# Altium PCB BOARD_4LAYER.PcbDoc (part 18 of 21)
Units mil, origin at the board's own origin, x right, y up, seen from the top; angles counter-clockwise.
Board outline 6692.91 x 10039.37 mil, 4 copper layers (Top Layer, Mid Layer 1, Mid Layer 2, Bottom Layer), stack 66.299 mil thick; 1532 components, 908 nets, 4105 pads, 1286 vias.
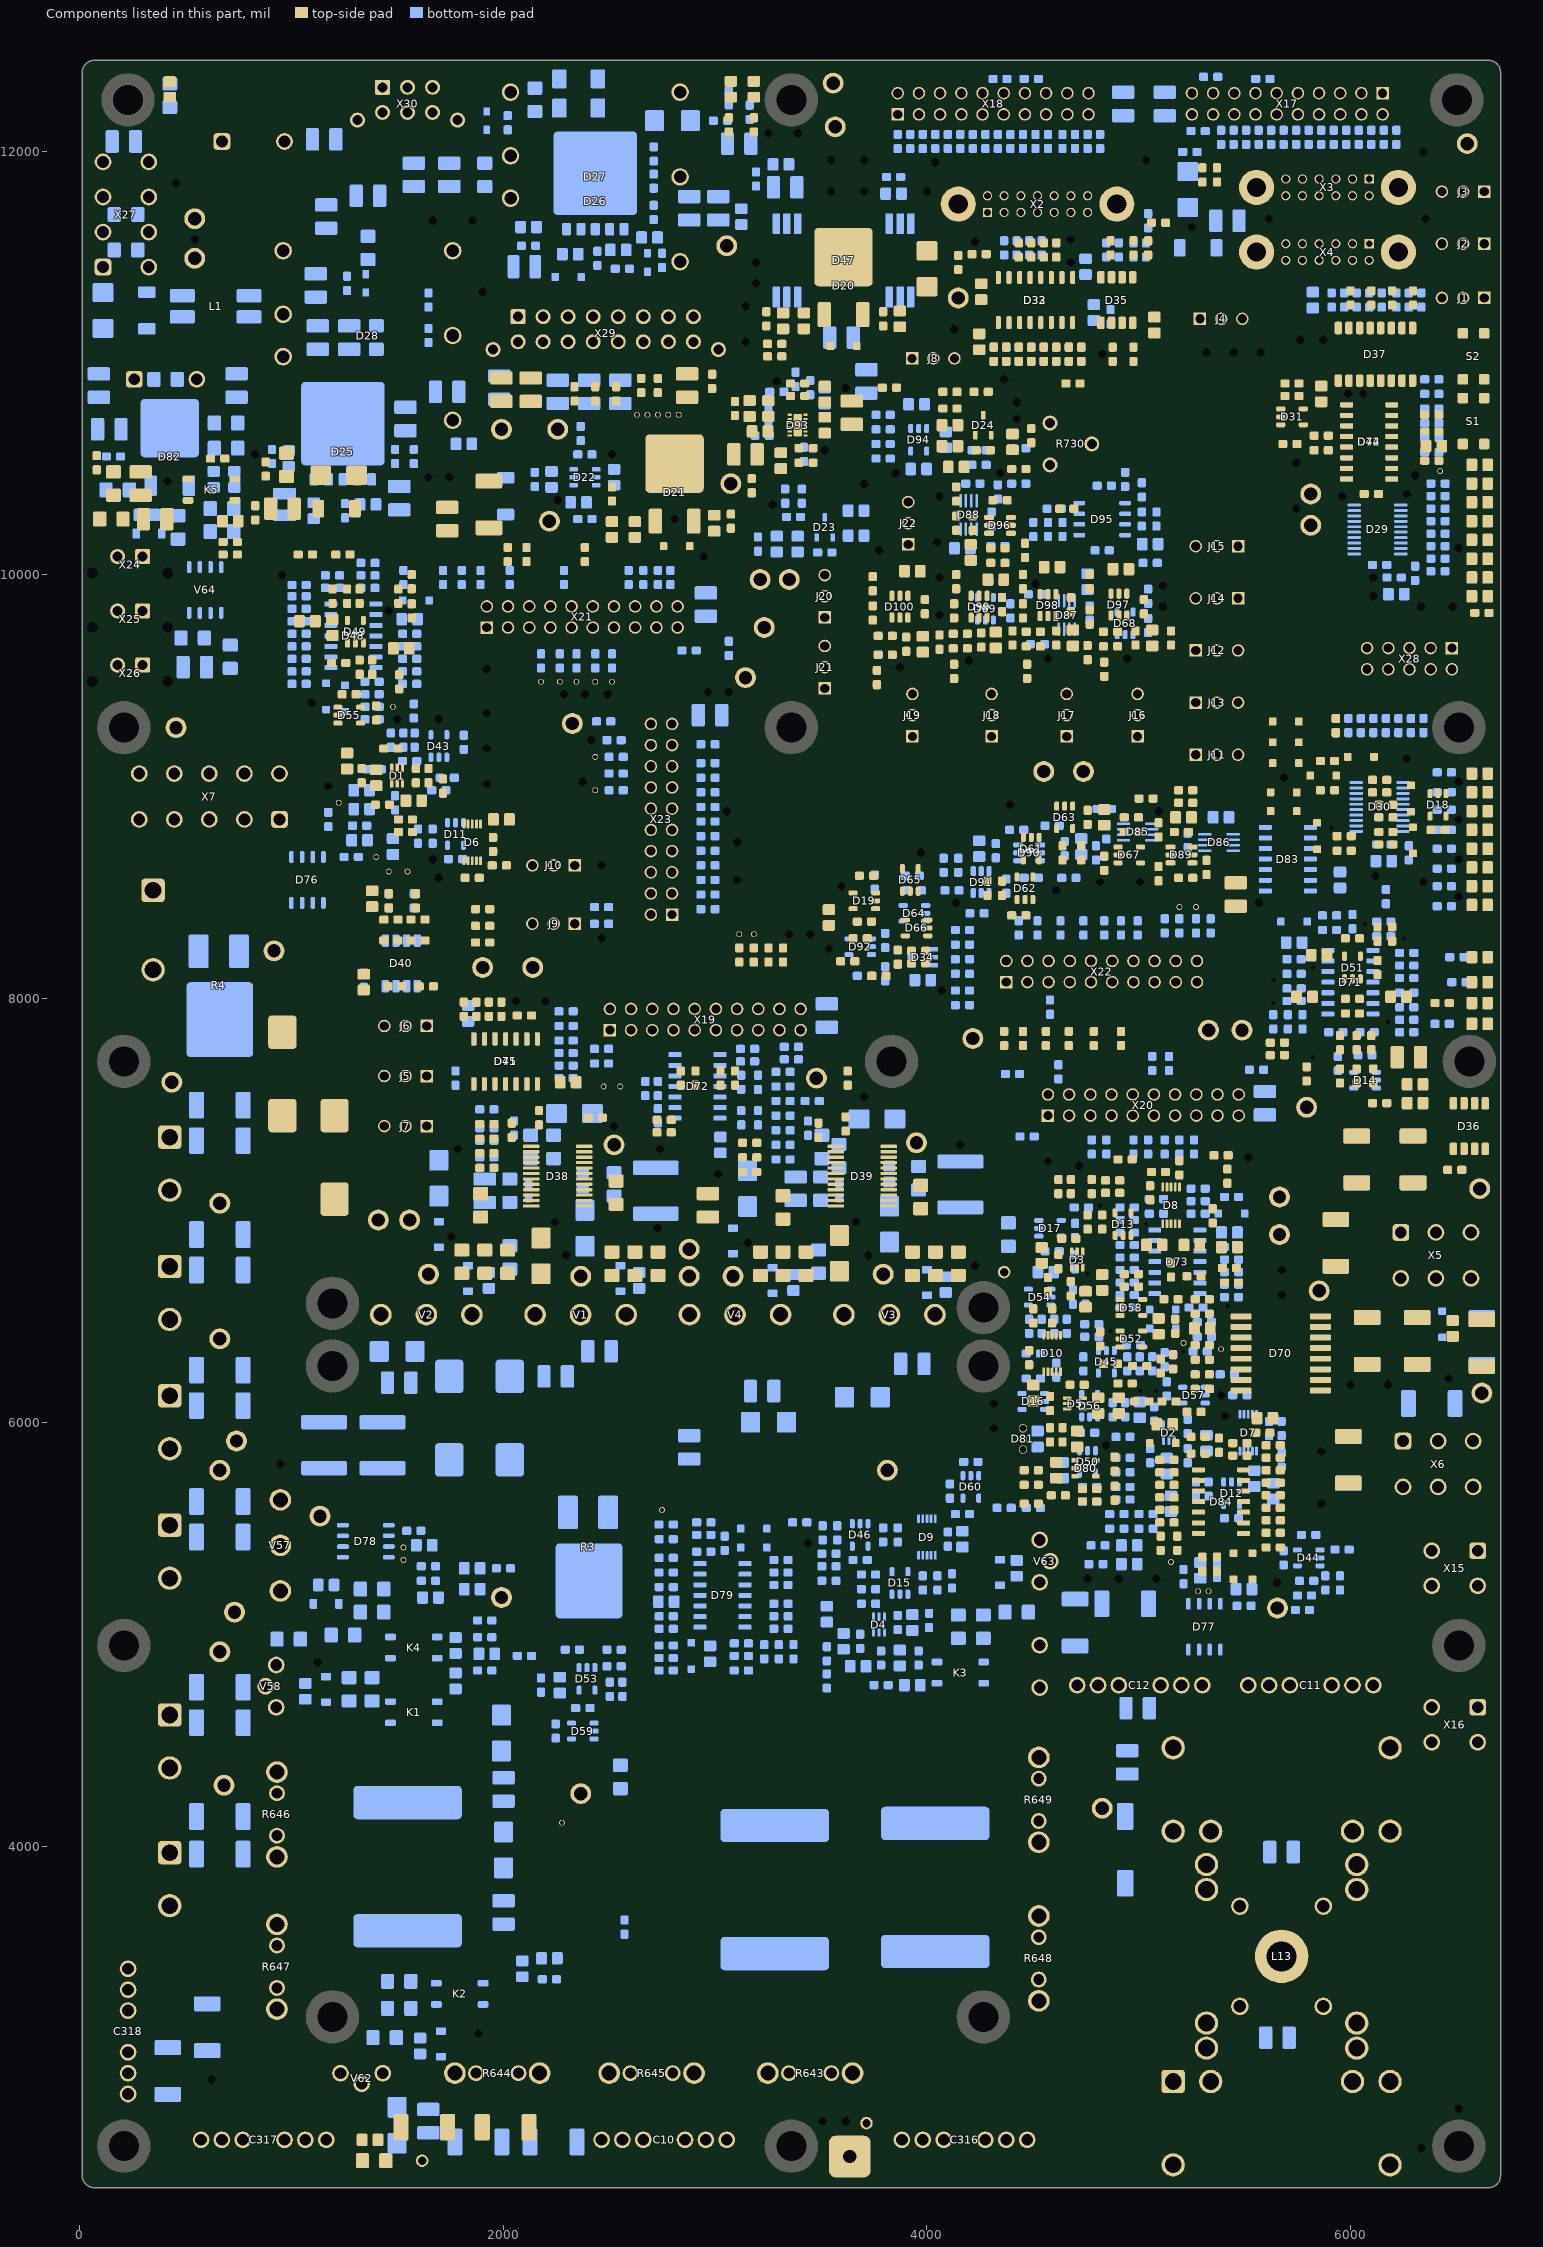
[diagram p20: the components of this part, seen from the top]

## Polygon pours and split planes (outlines as drawn) (continued)
$6N134 on Mid Layer 1 "$6N134_L-01_P114" (solid, remove dead copper, pour order 114): 643.7,3216.54 761.81,3216.54 761.81,3846.46 643.7,3846.46
$6N134 on Mid Layer 1 "$6N134_L-01_P113" (solid, remove dead copper, pour order 113): 643.7,3846.46 978.35,3846.46 978.35,4122.05 643.7,4122.05
$6N135 on Mid Layer 1 "$6N135_L-01_P105" (solid, remove dead copper, pour order 105): 4275.59,4525.59 2966.54,4525.59 2750,4309.06 2750,4387.8 2956.69,4594.49 4275.59,4594.49
$6N135 on Mid Layer 1 "$6N135_L-01_P104" (solid, remove dead copper, pour order 104): 4423.23,5194.88 4324.8,5194.88 4324.8,4525.59 4275.59,4525.59 4275.59,5263.78 4423.23,5263.78
$6N135 on Mid Layer 1 "$6N135_L-01_P102" (solid, remove dead copper, pour order 102): 4580.71,5411.42 4423.23,5411.42 4423.23,5263.78 4374.02,5263.78 4374.02,5431.1 4462.6,5519.69 4580.71,5519.69
$6N135 on Mid Layer 1 "$6N135_L-01_P094" (solid, remove dead copper, pour order 94): 1175.2,3472.44 1844.49,3472.44 1844.49,3846.46 1175.2,3846.46
$6N135 on Mid Layer 1 "$6N135_L-01_P091" (solid, remove dead copper, pour order 91): 1175.2,3472.44 860.24,3472.44 860.24,3748.03 1057.09,3748.03 1057.09,4200.79 801.18,4200.79 801.18,4338.58 722.44,4417.32 722.44,4811.02 919.29,4811.02 919.29,4712.6 840.55,4712.6 840.55,4476.38 1175.2,4476.38
$6N135 on Mid Layer 1 "$6N135_L-01_P084" (solid, remove dead copper, pour order 84): 2326.77,3708.66 2435.04,3708.66 2435.04,3944.88 2326.77,3944.88
$6N3156 on Mid Layer 1 "$6N3156_L-01_P080" (solid, remove dead copper, pour order 80): 3517.72,2842.52 3714.57,2842.52 3714.57,3059.06 3517.72,3059.06
$6N3156 on Mid Layer 1 "$6N3156_L-01_P075" (solid, remove dead copper, pour order 75): 2021.65,2881.89 2238.19,2881.89 2238.19,3118.11 2021.65,3118.11
$6N3156 on Mid Layer 1 "$6N3156_L-01_P074" (solid, remove dead copper, pour order 74): 2021.65,3118.11 2750,3118.11 2750,3216.54 2021.65,3216.54
$6N3156 on Mid Layer 1 "$6N3156_L-01_P073" (solid, remove dead copper, pour order 73): 2927.17,3059.06 3714.57,3059.06 3714.57,3137.8 2927.17,3137.8
$6N3156 on Mid Layer 1 "$6N3156_L-01_P067" (solid, remove dead copper, pour order 67): 3616.14,3885.83 2927.17,3885.83 2927.17,3059.06 2966.54,3059.06 2966.54,2881.89 2750,2881.89 2750,3915.35 3074.8,4240.16 3616.14,4240.16
$6N106 on Mid Layer 1 "$6N106_L-01_P065" (solid, remove dead copper, pour order 65): 1903.54,3393.7 1982.28,3393.7 1982.28,4417.32 1903.54,4417.32
$6N106 on Mid Layer 1 "$6N106_L-01_P064" (solid, remove dead copper, pour order 64): 1509.84,3334.65 1982.28,3334.65 1982.28,3393.7 1509.84,3393.7
$6N106 on Mid Layer 1 "$6N106_L-01_P063" (solid, remove dead copper, pour order 63): 1411.42,3000 1509.84,3000 1509.84,3393.7 1411.42,3393.7
$6N106 on Mid Layer 1 "$6N106_L-01_P062" (solid, remove dead copper, pour order 62): 1352.36,4417.32 1982.28,4417.32 1982.28,4476.38 1352.36,4476.38
$6N106 on Mid Layer 1 "$6N106_L-01_P060" (solid, remove dead copper, pour order 60): 1253.94,4417.32 1352.36,4417.32 1352.36,4564.96 1253.94,4564.96
$6N106 on Mid Layer 1 "$6N106_L-01_P059" (solid, remove dead copper, pour order 59): 919.29,4564.96 1352.36,4564.96 1352.36,4702.76 919.29,4702.76
$6N106 on Mid Layer 1 "$6N106_L-01_P052" (solid, remove dead copper, pour order 52): 17 vertices, not listed, extent 1411.42,2566.93 3399.61,3059.06
$6N3315 on Mid Layer 1 "$6N3315_L-01_P048" (solid, remove dead copper, pour order 48): 21 vertices, not listed, extent 4364.17,3196.85 4718.5,5401.57
+U_AMP on Mid Layer 1 "+U_AMP_L-01_P044" (solid, remove dead copper, pour order 44): 6175.2,5362.2 6687.01,5362.2 6687.01,5480.31 6175.2,5480.31
+U_AMP on Mid Layer 1 "+U_AMP_L-01_P040" (solid, remove dead copper, pour order 40): 6293.31,4633.86 6687.01,4633.86 6687.01,4771.65 6293.31,4771.65
$6N94 on Mid Layer 1 "$6N94_L-01_P037" (solid, remove dead copper, pour order 37): 4127.95,2409.45 3812.99,2409.45 3812.99,3196.85 3025.59,3196.85 3025.59,3688.98 3616.14,3688.98 3616.14,3295.28 3911.42,3295.28 3911.42,2763.78 4127.95,2763.78
$6N94 on Mid Layer 1 "$6N94_L-01_P034" (solid, remove dead copper, pour order 34): 5564.96,2842.52 4856.3,2842.52 4856.3,3472.44 5466.54,3472.44 5466.54,3314.96 5564.96,3314.96
$6N101 on Mid Layer 1 "$6N101_L-01_P027" (solid, remove dead copper, pour order 27): 5702.76,4673.23 5564.96,4535.43 5564.96,3669.29 5466.54,3669.29 5466.54,3570.87 4836.61,3570.87 4836.61,3925.2 5053.15,3925.2 5053.15,4555.12 5407.48,4555.12 5407.48,4771.65 5702.76,4771.65
$6N737 on Mid Layer 1 "$6N737_L-01_P022" (solid, remove dead copper, pour order 22): 4777.56,2507.87 4226.38,2507.87 4226.38,2842.52 3990.16,2842.52 3990.16,3374.02 3753.94,3374.02 3753.94,3629.92 4324.8,3629.92 4324.8,3374.02 4088.58,3374.02 4088.58,2980.32 4777.56,2980.32
$6N737 on Mid Layer 1 "$6N737_L-01_P019" (solid, remove dead copper, pour order 19): 6687.01,2803.15 6293.31,2803.15 6293.31,2409.45 5781.5,2409.45 5781.5,3314.96 5879.92,3314.96 5879.92,3472.44 6687.01,3472.44
-U_AMP on Mid Layer 1 "-U_AMP_L-01_P011" (solid, remove dead copper, pour order 11): 6312.99,5125.98 6687.01,5125.98 6687.01,5263.78 6312.99,5263.78
-U_AMP on Mid Layer 1 "-U_AMP_L-01_P006" (solid, remove dead copper, pour order 6): 6687.01,3570.87 5879.92,3570.87 5879.92,3669.29 5781.5,3669.29 5781.5,4456.69 5840.55,4515.75 5840.55,4771.65 6135.83,4771.65 6135.83,4515.75 6687.01,4515.75
no net on Mid Layer 1 (solid, remove dead copper, pour order 0): 2996.06,5913.39 3192.91,5913.39 3192.91,6090.55 2996.06,6090.55
$4N4003 on Bottom Layer "$4N4003_L02_P652" (solid, remove dead copper, pour order 652): 230.31,10342.52 387.8,10342.52 387.8,10460.63 230.31,10460.63
$4N4003 on Bottom Layer "$4N4003_L02_P651" (solid, remove dead copper, pour order 651): 33.46,10460.63 387.8,10460.63 387.8,10509.84 33.46,10509.84
$4N4003 on Bottom Layer "$4N4003_L02_P650" (solid, remove dead copper, pour order 650): 33.46,10509.84 112.2,10509.84 112.2,10883.86 33.46,10883.86
$4N4003 on Bottom Layer "$4N4003_L02_P649" (solid, remove dead copper, pour order 649): 112.2,10785.43 181.1,10785.43 181.1,10883.86 112.2,10883.86
$4N4003 on Bottom Layer "$4N4003_L02_P648" (solid, remove dead copper, pour order 648): 112.2,10726.38 171.26,10785.43 112.2,10785.43
$6N103 on Bottom Layer "$6N103_L02_P647" (solid, remove dead copper, pour order 647): 4994.09,4043.31 4679.13,4043.31 4679.13,4535.43 4462.6,4535.43 4462.6,4811.02 4541.34,4811.02 4541.34,4633.86 4816.93,4633.86 4816.93,4377.95 4994.09,4377.95
I_AMP on Bottom Layer "I_AMP_L02_P646" (solid, remove dead copper, pour order 646): 5289.37,4870.08 4620.08,4870.08 4620.08,4889.76 4482.28,4889.76 4482.28,5007.87 5289.37,5007.87
I_AMP on Bottom Layer "I_AMP_L02_P645" (solid, remove dead copper, pour order 645): 4620.08,4692.91 4974.41,4692.91 4974.41,4870.08 4620.08,4870.08
GND_UM on Bottom Layer "GND_UM_L02_P633" (solid, remove dead copper, pour order 633): 4521.65,12320.87 4994.09,12320.87 4994.09,12389.76 4521.65,12389.76
GND_UM on Bottom Layer "GND_UM_L02_P630" (solid, remove dead copper, pour order 630): 3458.66,11346.46 3488.19,11346.46 3488.19,11671.26 3458.66,11671.26
GND_UM on Bottom Layer "GND_UM_L02_P629" (solid, remove dead copper, pour order 629): 6273.62,11907.48 6687.01,11907.48 6687.01,12389.76 6273.62,12389.76
GND_UM on Bottom Layer "GND_UM_L02_P627" (solid, remove dead copper, pour order 627): 3488.19,11228.35 3763.78,11228.35 3763.78,12389.76 3488.19,12389.76
GND_UM on Bottom Layer "GND_UM_L02_P626" (solid, remove dead copper, pour order 626): 3458.66,11228.35 3488.19,11228.35 3488.19,11346.46 3458.66,11346.46
GND_UM on Bottom Layer "GND_UM_L02_P625" (solid, remove dead copper, pour order 625): 3763.78,11454.72 3832.68,11454.72 3832.68,12045.28 3763.78,12045.28
GND_UM on Bottom Layer "GND_UM_L02_P624" (solid, remove dead copper, pour order 624): 3832.68,11454.72 3763.78,11385.83 3763.78,11454.72
GND_UM on Bottom Layer "GND_UM_L02_P623" (solid, remove dead copper, pour order 623): 3458.66,11671.26 3488.19,11700.79 3488.19,11671.26
GND_UM on Bottom Layer "GND_UM_L02_P622" (solid, remove dead copper, pour order 622): 4068.9,11375.98 4285.43,11375.98 4285.43,11641.73 4068.9,11641.73
GND_UM on Bottom Layer "GND_UM_L02_P621" (solid, remove dead copper, pour order 621): 4226.38,11228.35 4285.43,11228.35 4285.43,11375.98 4226.38,11375.98
GND_UM on Bottom Layer "GND_UM_L02_P620" (solid, remove dead copper, pour order 620): 4187.01,11375.98 4226.38,11336.61 4226.38,11375.98
GND_UM on Bottom Layer "GND_UM_L02_P619" (solid, remove dead copper, pour order 619): 4954.72,11740.16 5092.52,11740.16 5092.52,12114.17 4954.72,12114.17
GND_UM on Bottom Layer "GND_UM_L02_P618" (solid, remove dead copper, pour order 618): 5092.52,11740.16 5151.57,11740.16 5151.57,11927.17 5092.52,11927.17
GND_UM on Bottom Layer "GND_UM_L02_P617" (solid, remove dead copper, pour order 617): 5092.52,11986.22 5151.57,11927.17 5092.52,11927.17
GND_UM on Bottom Layer "GND_UM_L02_P616" (solid, remove dead copper, pour order 616): 4994.09,12114.17 5043.31,12114.17 5043.31,12389.76 4994.09,12389.76
GND_UM on Bottom Layer "GND_UM_L02_P615" (solid, remove dead copper, pour order 615): 5043.31,12340.55 5250,12340.55 5250,12389.76 5043.31,12389.76
GND_UM on Bottom Layer "GND_UM_L02_P614" (solid, remove dead copper, pour order 614): 5663.39,11188.98 5879.92,11188.98 5879.92,11267.72 5663.39,11267.72
GND_UM on Bottom Layer "GND_UM_L02_P613" (solid, remove dead copper, pour order 613): 5663.39,11267.72 5742.13,11267.72 5742.13,11336.61 5663.39,11336.61
GND_UM on Bottom Layer "GND_UM_L02_P597" (solid, remove dead copper, pour order 597): 6175.2,11907.48 6273.62,12005.91 6273.62,11907.48
GND_UM on Bottom Layer "GND_UM_L02_P596" (solid, remove dead copper, pour order 596): 6145.67,11464.57 6342.52,11464.57 6342.52,11907.48 6145.67,11907.48
GND_UM on Bottom Layer "GND_UM_L02_P595" (solid, remove dead copper, pour order 595): 4797.24,11336.61 5742.13,11336.61 5742.13,11375.98 4797.24,11375.98
$4N2819 on Bottom Layer "$4N2819_L02_P591" (solid, remove dead copper, pour order 591): 1185.04,12035.43 1263.78,12035.43 1263.78,12153.54 1185.04,12153.54
$4N2819 on Bottom Layer "$4N2819_L02_P588" (solid, remove dead copper, pour order 588): 1185.04,11917.32 2120.08,11917.32 2120.08,12094.49 1185.04,12094.49
$4N2811 on Bottom Layer "$4N2811_L02_P584" (solid, remove dead copper, pour order 584): 1372.05,11710.63 2120.08,11710.63 2120.08,11868.11 1372.05,11868.11
$4N2807 on Bottom Layer "$4N2807_L02_P580" (solid, remove dead copper, pour order 580): 919.29,11169.29 1460.63,11169.29 1460.63,11346.46 919.29,11346.46
$4N2806 on Bottom Layer "$4N2806_L02_P573" (solid, remove dead copper, pour order 573): 919.29,10972.44 1559.06,10972.44 1559.06,11090.55 919.29,11090.55
$4N2806 on Bottom Layer "$4N2806_L02_P572" (solid, remove dead copper, pour order 572): 1509.84,11090.55 1559.06,11090.55 1559.06,11671.26 1509.84,11671.26
$4N2806 on Bottom Layer "$4N2806_L02_P571" (solid, remove dead copper, pour order 571): 1076.77,11582.68 1509.84,11582.68 1509.84,11671.26 1076.77,11671.26
$4N4014 on Bottom Layer "$4N4014_L02_P566" (solid, remove dead copper, pour order 566): 250,9496.06 515.75,9496.06 515.75,9712.6 250,9712.6
$4N4014 on Bottom Layer "$4N4014_L02_P562" (solid, remove dead copper, pour order 562): 427.17,9761.81 683.07,9761.81 683.07,9899.61 427.17,9899.61
$4N4014 on Bottom Layer "$4N4014_L02_P561" (solid, remove dead copper, pour order 561): 466.54,9712.6 515.75,9712.6 515.75,9761.81 466.54,9761.81
$4N4005 on Bottom Layer "$4N4005_L02_P557" (solid, remove dead copper, pour order 557): 250,10145.67 309.06,10145.67 309.06,10312.99 250,10312.99
$4N4005 on Bottom Layer "$4N4005_L02_P556" (solid, remove dead copper, pour order 556): 250,9742.13 397.64,9742.13 397.64,10145.67 250,10145.67
$4N4005 on Bottom Layer "$4N4005_L02_P555" (solid, remove dead copper, pour order 555): 397.64,9948.82 624.02,9948.82 624.02,10086.61 397.64,10086.61
$4N4016 on Bottom Layer "$4N4016_L02_P540" (solid, remove dead copper, pour order 540): 43.31,9496.06 210.63,9496.06 210.63,10175.2 43.31,10175.2
$4N4016 on Bottom Layer "$4N4016_L02_P539" (solid, remove dead copper, pour order 539): 161.42,10175.2 210.63,10175.2 210.63,10312.99 161.42,10312.99
$4N4016 on Bottom Layer "$4N4016_L02_P538" (solid, remove dead copper, pour order 538): 33.46,10175.2 161.42,10175.2 161.42,10440.94 33.46,10440.94
-U_VENT on Bottom Layer "-U_VENT_L02_P535" (solid, remove dead copper, pour order 535): 692.91,11474.41 889.76,11474.41 889.76,11661.42 692.91,11661.42
-U_VENT on Bottom Layer "-U_VENT_L02_P534" (solid, remove dead copper, pour order 534): 692.91,11395.67 1194.88,11395.67 1194.88,11474.41 692.91,11474.41
-U_VENT on Bottom Layer "-U_VENT_L02_P533" (solid, remove dead copper, pour order 533): 692.91,11287.4 889.76,11287.4 889.76,11395.67 692.91,11395.67
-U_VENT on Bottom Layer "-U_VENT_L02_P530" (solid, remove dead copper, pour order 530): 653.54,10913.39 801.18,10913.39 801.18,10982.28 653.54,10982.28
-U_VENT on Bottom Layer "-U_VENT_L02_P529" (solid, remove dead copper, pour order 529): 437.01,10864.17 653.54,10864.17 653.54,10982.28 437.01,10982.28
-U_VENT on Bottom Layer "-U_VENT_L02_P528" (solid, remove dead copper, pour order 528): 870.08,11976.38 1125.98,11976.38 1125.98,12133.86 870.08,12133.86
+U_VENT on Bottom Layer "+U_VENT_L02_P518" (solid, remove dead copper, pour order 518): 692.91,11061.02 791.34,11061.02 791.34,11179.13 692.91,11179.13
+U_VENT on Bottom Layer "+U_VENT_L02_P517" (solid, remove dead copper, pour order 517): 377.95,11021.65 791.34,11021.65 791.34,11061.02 377.95,11061.02
+U_VENT on Bottom Layer "+U_VENT_L02_P516" (solid, remove dead copper, pour order 516): 692.91,11159.45 889.76,11159.45 889.76,11248.03 692.91,11248.03
+U_VENT on Bottom Layer "+U_VENT_L02_P513" (solid, remove dead copper, pour order 513): 33.46,10913.39 200.79,10913.39 200.79,11061.02 33.46,11061.02
+U_VENT on Bottom Layer "+U_VENT_L02_P512" (solid, remove dead copper, pour order 512): 200.79,10864.17 377.95,10864.17 377.95,11061.02 200.79,11061.02
+U_VENT on Bottom Layer "+U_VENT_L02_P508" (solid, remove dead copper, pour order 508): 791.34,11021.65 889.76,11021.65 889.76,11159.45 791.34,11159.45
+U_VENT on Bottom Layer "+U_VENT_L02_P507" (solid, remove dead copper, pour order 507): 751.97,11710.63 1312.99,11710.63 1312.99,11868.11 751.97,11868.11
+U_VENT on Bottom Layer "+U_VENT_L02_P506" (solid, remove dead copper, pour order 506): 653.54,11710.63 751.97,11710.63 751.97,11986.22 653.54,11986.22
+U_VENT on Bottom Layer "+U_VENT_L02_P505" (solid, remove dead copper, pour order 505): 486.22,11986.22 771.65,11986.22 771.65,12389.76 486.22,12389.76
+U_VENT on Bottom Layer "+U_VENT_L02_P504" (solid, remove dead copper, pour order 504): 486.22,11789.37 653.54,11789.37 653.54,11986.22 486.22,11986.22
+U_VENT on Bottom Layer "+U_VENT_L02_P503" (solid, remove dead copper, pour order 503): 771.65,12242.13 1795.28,12242.13 1795.28,12389.76 771.65,12389.76
+U_VENT on Bottom Layer "+U_VENT_L02_P502" (solid, remove dead copper, pour order 502): 771.65,11868.11 830.71,11868.11 830.71,12242.13 771.65,12242.13
+U_VENT on Bottom Layer "+U_VENT_L02_P501" (solid, remove dead copper, pour order 501): 751.97,11868.11 771.65,11868.11 771.65,11986.22 751.97,11986.22
$4N2816 on Bottom Layer "$4N2816_L02_P500" (solid, remove dead copper, pour order 500): 43.31,11090.55 574.8,11090.55 574.8,11238.19 43.31,11238.19
-U_UM on Bottom Layer "-U_UM_L02_P496" (solid, remove dead copper, pour order 496): 407.48,11287.4 574.8,11287.4 574.8,11405.51 407.48,11405.51
-U_UM on Bottom Layer "-U_UM_L02_P494" (solid, remove dead copper, pour order 494): 230.31,11287.4 417.32,11287.4 417.32,12094.49 230.31,12094.49
+U_UM on Bottom Layer "+U_UM_L02_P490" (solid, remove dead copper, pour order 490): 43.31,11267.72 181.1,11267.72 181.1,12094.49 43.31,12094.49
+15V on Bottom Layer "+15V_L02_P482" (solid, remove dead copper, pour order 482): 2080.71,7438.98 2129.92,7438.98 2129.92,7517.72 2080.71,7517.72
+15V on Bottom Layer "+15V_L02_P478" (solid, remove dead copper, pour order 478): 3527.56,7409.45 3576.77,7409.45 3576.77,7478.35 3527.56,7478.35
GND on Bottom Layer "GND_L02_P471" (solid, remove dead copper, pour order 471): 2188.98,7124.02 2248.03,7124.02 2248.03,7183.07 2188.98,7183.07
GND on Bottom Layer "GND_L02_P470" (solid, remove dead copper, pour order 470): 3625.98,7124.02 3694.88,7124.02 3694.88,7183.07 3625.98,7183.07
GND on Bottom Layer "GND_L02_P415" (solid, remove dead copper, pour order 415): 5417.32,10194.88 5889.76,10194.88 5889.76,10854.33 5417.32,10854.33
GND on Bottom Layer "GND_L02_P414" (solid, remove dead copper, pour order 414): 5515.75,9043.31 5879.92,9043.31 5879.92,10194.88 5515.75,10194.88
GND on Bottom Layer "GND_L02_P413" (solid, remove dead copper, pour order 413): 5161.42,8915.35 5417.32,8915.35 5417.32,11129.92 5161.42,11129.92
GND on Bottom Layer "GND_L02_P412" (solid, remove dead copper, pour order 412): 5417.32,8925.2 5801.18,8925.2 5801.18,9043.31 5417.32,9043.31
GND on Bottom Layer "GND_L02_P411" (solid, remove dead copper, pour order 411): 3734.25,8935.04 5161.42,8935.04 5161.42,9171.26 3734.25,9171.26
GND on Bottom Layer "GND_L02_P410" (solid, remove dead copper, pour order 410): 3734.25,8748.03 4295.28,8748.03 4295.28,8935.04 3734.25,8935.04
GND on Bottom Layer "GND_L02_P409" (solid, remove dead copper, pour order 409): 5633.86,10982.28 6687.01,10982.28 6687.01,11139.76 5633.86,11139.76
GND on Bottom Layer "GND_L02_P408" (solid, remove dead copper, pour order 408): 5358.27,10854.33 5633.86,10854.33 5633.86,11257.87 5358.27,11257.87
GND on Bottom Layer "GND_L02_P407" (solid, remove dead copper, pour order 407): 5633.86,10952.76 6480.31,10952.76 6480.31,10982.28 5633.86,10982.28
GND on Bottom Layer "GND_L02_P406" (solid, remove dead copper, pour order 406): 6381.89,11139.76 6578.74,11139.76 6578.74,11877.95 6381.89,11877.95
GND on Bottom Layer "GND_L02_P405" (solid, remove dead copper, pour order 405): 6578.74,11139.76 6687.01,11139.76 6687.01,11238.19 6578.74,11238.19
GND on Bottom Layer "GND_L02_P404" (solid, remove dead copper, pour order 404): 6549.21,9427.17 6687.01,9427.17 6687.01,10982.28 6549.21,10982.28
GND on Bottom Layer "GND_L02_P403" (solid, remove dead copper, pour order 403): 1874.02,9151.57 2120.08,9151.57 2120.08,9643.7 1874.02,9643.7
GND on Bottom Layer "GND_L02_P402" (solid, remove dead copper, pour order 402): 1834.65,8688.98 2218.5,8688.98 2218.5,8974.41 1834.65,8974.41
GND on Bottom Layer "GND_L02_P401" (solid, remove dead copper, pour order 401): 2218.5,8688.98 2602.36,8688.98 2602.36,8905.51 2218.5,8905.51
GND on Bottom Layer "GND_L02_P400" (solid, remove dead copper, pour order 400): 1775.59,8974.41 2316.93,8974.41 2316.93,9151.57 1775.59,9151.57
GND on Bottom Layer "GND_L02_P399" (solid, remove dead copper, pour order 399): 2218.5,8905.51 2316.93,8905.51 2316.93,8974.41 2218.5,8974.41
GND on Bottom Layer "GND_L02_P398" (solid, remove dead copper, pour order 398): 2120.08,9151.57 2248.03,9151.57 2248.03,9437.01 2120.08,9437.01
GND on Bottom Layer "GND_L02_P397" (solid, remove dead copper, pour order 397): 5909.45,10834.65 6234.25,10834.65 6234.25,10952.76 5909.45,10952.76
GND on Bottom Layer "GND_L02_P396" (solid, remove dead copper, pour order 396): 6480.31,10952.76 6549.21,10952.76 6549.21,10982.28 6480.31,10982.28
GND on Bottom Layer "GND_L02_P394" (solid, remove dead copper, pour order 394): 4295.28,8866.14 4748.03,8866.14 4748.03,8935.04 4295.28,8935.04
GND on Bottom Layer "GND_L02_P393" (solid, remove dead copper, pour order 393): 4078.74,7438.98 4403.54,7438.98 4403.54,7586.61 4078.74,7586.61
GND on Bottom Layer "GND_L02_P392" (solid, remove dead copper, pour order 392): 3655.51,7694.88 4531.5,7694.88 4531.5,7901.57 3655.51,7901.57
GND on Bottom Layer "GND_L02_P391" (solid, remove dead copper, pour order 391): 3655.51,7586.61 4324.8,7586.61 4324.8,7694.88 3655.51,7694.88
GND on Bottom Layer "GND_L02_P390" (solid, remove dead copper, pour order 390): 4354.33,6976.38 4403.54,6976.38 4403.54,7438.98 4354.33,7438.98
$2N3778 on Bottom Layer "$2N3778_L02_P389" (solid, remove dead copper, pour order 389): 3625.98,7025.59 3665.35,7025.59 3665.35,7104.33 3625.98,7104.33
$2N3800 on Bottom Layer "$2N3800_L02_P385" (solid, remove dead copper, pour order 385): 2188.98,7025.59 2238.19,7025.59 2238.19,7104.33 2188.98,7104.33
UL on Bottom Layer "UL_L02_P377" (solid, remove dead copper, pour order 377): 3163.39,6612.2 3124.02,6651.57 3124.02,6612.2
UL on Bottom Layer "UL_L02_P376" (solid, remove dead copper, pour order 376): 3025.59,6612.2 3124.02,6612.2 3124.02,6809.06 3025.59,6809.06
UL on Bottom Layer "UL_L02_P373" (solid, remove dead copper, pour order 373): 3931.1,6917.32 4009.84,6917.32 4009.84,7015.75 3931.1,7015.75
UL on Bottom Layer "UL_L02_P366" (solid, remove dead copper, pour order 366): 17 vertices, not listed, extent 673.23,5913.39 2218.5,8334.65
UL on Bottom Layer "UL_L02_P359" (solid, remove dead copper, pour order 359): 3665.35,6297.24 3192.91,6297.24 3192.91,5913.39 2513.78,5913.39 2513.78,6080.71 3025.59,6080.71 3025.59,6612.2 3163.39,6612.2 3163.39,6366.14 3527.56,6366.14 3527.56,6612.2 3665.35,6612.2
~U_TP on Bottom Layer "~U_TP_L02_P358" (solid, remove dead copper, pour order 358): 948.82,9013.78 131.89,9013.78 131.89,8334.65 614.17,8334.65 614.17,8137.8 407.48,8137.8 407.48,8059.06 43.31,8059.06 43.31,8334.65 33.46,8334.65 33.46,9112.2 948.82,9112.2
U_TP on Bottom Layer "U_TP_L02_P354" (solid, remove dead copper, pour order 354): 1066.93,8393.7 948.82,8393.7 948.82,8433.07 230.31,8433.07 230.31,8895.67 998.03,8895.67 998.03,8797.24 850.39,8797.24 850.39,8511.81 1066.93,8511.81
$2N2430 on Bottom Layer "$2N2430_L02_P348" (solid, remove dead copper, pour order 348): 2100.39,5726.38 1017.72,5726.38 1017.72,5844.49 1657.48,5844.49 1657.48,5903.54 2100.39,5903.54
U_MOST on Bottom Layer "U_MOST_L02_P346" (solid, remove dead copper, pour order 346): 2385.83,5500 2179.13,5500 2110.24,5568.9 1568.9,5568.9 1549.21,5588.58 1303.15,5588.58 1303.15,5450.79 1185.04,5450.79 1185.04,5667.32 1637.8,5667.32 1657.48,5647.64 2159.45,5647.64 2188.98,5677.17 2385.83,5677.17
U_MOST on Bottom Layer "U_MOST_L02_P341" (solid, remove dead copper, pour order 341): 1076.77,5529.53 1185.04,5529.53 1185.04,5667.32 1076.77,5667.32
I_MOST on Bottom Layer "I_MOST_L02_P333" (solid, remove dead copper, pour order 333): 1116.14,5322.83 1303.15,5322.83 1303.15,5342.52 1116.14,5342.52
I_MOST on Bottom Layer "I_MOST_L02_P331" (solid, remove dead copper, pour order 331): 1303.15,5342.52 879.92,5342.52 879.92,5490.16 1165.35,5490.16 1165.35,5440.94 1303.15,5440.94
UH on Bottom Layer "UH_L02_P326" (solid, remove dead copper, pour order 326): 2208.66,6139.76 1588.58,6139.76 1588.58,6730.31 1086.61,6730.31 1086.61,8511.81 1214.57,8511.81 1214.57,6838.58 1706.69,6838.58 1706.69,6366.14 2070.87,6366.14 2070.87,6612.2 2208.66,6612.2
UH on Bottom Layer "UH_L02_P317" (solid, remove dead copper, pour order 317): 2494.09,6907.48 2572.83,6907.48 2572.83,6986.22 2494.09,6986.22
PGND on Bottom Layer "PGND_L02_P312" (solid, remove dead copper, pour order 312): 1765.75,5372.05 2159.45,5372.05 2159.45,5440.94 1765.75,5440.94
PGND on Bottom Layer "PGND_L02_P311" (solid, remove dead copper, pour order 311): 1765.75,5440.94 2159.45,5440.94 2159.45,5450.79 1765.75,5450.79
PGND on Bottom Layer "PGND_L02_P310" (solid, remove dead copper, pour order 310): 2159.45,5007.87 2631.89,5007.87 2631.89,5450.79 2159.45,5450.79
PGND on Bottom Layer "PGND_L02_P309" (solid, remove dead copper, pour order 309): 3970.47,5627.95 2681.1,5627.95 2681.1,5421.26 2631.89,5421.26 2631.89,5431.1 2671.26,5431.1 2671.26,5637.8 3960.63,5637.8 3960.63,5883.86 3970.47,5883.86
PGND on Bottom Layer "PGND_L02_P307" (solid, remove dead copper, pour order 307): 4561.02,4299.21 4305.12,4299.21 4305.12,3925.2 3773.62,3925.2 3773.62,4299.21 3094.49,4299.21 3094.49,4683.07 4393.7,4683.07 4393.7,4456.69 4561.02,4456.69
PGND on Bottom Layer "PGND_L02_P304" (solid, remove dead copper, pour order 304): 33.46,9387.8 574.8,9387.8 574.8,9427.17 33.46,9427.17
PGND on Bottom Layer "PGND_L02_P299" (solid, remove dead copper, pour order 299): 1372.05,6927.17 1342.52,6927.17 1342.52,7645.67 1273.62,7645.67 1273.62,8511.81 1293.31,8511.81 1293.31,7675.2 1372.05,7675.2
PGND on Bottom Layer "PGND_L02_P298" (solid, remove dead copper, pour order 298): 1076.77,8777.56 1057.09,8777.56 1057.09,9190.94 574.8,9190.94 574.8,9427.17 43.31,9427.17 43.31,9446.85 594.49,9446.85 594.49,9210.63 1076.77,9210.63
PGND on Bottom Layer "PGND_L02_P297" (solid, remove dead copper, pour order 297): 1372.05,6927.17 1618.11,6927.17 1618.11,7045.28 1372.05,7045.28
PGND on Bottom Layer "PGND_L02_P286" (solid, remove dead copper, pour order 286): 2937.01,6169.29 2494.09,6169.29 2494.09,6415.35 2779.53,6415.35 2779.53,6868.11 2937.01,6868.11
PGND on Bottom Layer "PGND_L02_P285" (solid, remove dead copper, pour order 285): 3281.5,6868.11 3360.24,6868.11 3360.24,6966.54 3281.5,6966.54
PGND on Bottom Layer "PGND_L02_P257" (solid, remove dead copper, pour order 257): 4462.6,3531.5 4600.39,3531.5 4600.39,3787.4 4462.6,3787.4
PGND on Bottom Layer "PGND_L02_P246" (solid, remove dead copper, pour order 246): 2809.06,2448.82 3104.33,2448.82 3104.33,2645.67 2809.06,2645.67
PGND on Bottom Layer "PGND_L02_P245" (solid, remove dead copper, pour order 245): 1824.8,2409.45 3104.33,2409.45 3104.33,2448.82 1824.8,2448.82
PGND on Bottom Layer "PGND_L02_P244" (solid, remove dead copper, pour order 244): 466.54,5165.35 33.46,5165.35 33.46,7192.91 486.22,7192.91 486.22,6917.32 151.57,6917.32 151.57,6562.99 505.91,6562.99 505.91,6326.77 151.57,6326.77 151.57,5342.52 466.54,5342.52
PGND on Bottom Layer "PGND_L02_P238" (solid, remove dead copper, pour order 238): 151.57,5765.75 486.22,5765.75 486.22,5982.28 151.57,5982.28
PGND on Bottom Layer "PGND_L02_P231" (solid, remove dead copper, pour order 231): 43.31,4751.97 427.17,4751.97 427.17,5165.35 43.31,5165.35
PGND on Bottom Layer "PGND_L02_P230" (solid, remove dead copper, pour order 230): 309.06,4751.97 250,4692.91 250,4751.97
PGND on Bottom Layer "PGND_L02_P229" (solid, remove dead copper, pour order 229): 23 vertices, not listed, extent 33.46,2409.45 1824.8,4751.97
PGND on Bottom Layer "PGND_L02_P209" (solid, remove dead copper, pour order 209): 3291.34,5913.39 3655.51,5913.39 3655.51,6218.5 3291.34,6218.5
PGND on Bottom Layer "PGND_L02_P208" (solid, remove dead copper, pour order 208): 3251.97,6061.02 3291.34,6061.02 3291.34,6218.5 3251.97,6218.5
PGND on Bottom Layer "PGND_L02_P202" (solid, remove dead copper, pour order 202): 1342.52,6139.76 1480.32,6139.76 1480.32,6641.73 1342.52,6641.73
PGND on Bottom Layer "PGND_L02_P177" (solid, remove dead copper, pour order 177): 3960.63,5883.86 4118.11,5883.86 4118.11,6415.35 3960.63,6415.35
$2N2408 on Bottom Layer "$2N2408_L02_P176" (solid, remove dead copper, pour order 176): 3891.73,5706.69 2572.83,5706.69 2572.83,5500 2405.51,5500 2405.51,5706.69 2297.24,5706.69 2297.24,6740.16 2435.04,6740.16 2435.04,5844.49 3763.78,5844.49 3763.78,6612.2 3891.73,6612.2
$2N2408 on Bottom Layer "$2N2408_L02_P169" (solid, remove dead copper, pour order 169): 3852.36,6651.57 3891.73,6612.2 3852.36,6612.2
$2N2408 on Bottom Layer "$2N2408_L02_P168" (solid, remove dead copper, pour order 168): 3744.09,6612.2 3763.78,6592.52 3763.78,6612.2
$2N2408 on Bottom Layer "$2N2408_L02_P167" (solid, remove dead copper, pour order 167): 3744.09,6612.2 3852.36,6612.2 3852.36,6700.79 3744.09,6700.79
U_TS on Bottom Layer "U_TS_L02_P157" (solid, remove dead copper, pour order 157): 5761.81,6070.87 5919.29,6070.87 5919.29,6307.09 5761.81,6307.09
U_TS on Bottom Layer "U_TS_L02_P150" (solid, remove dead copper, pour order 150): 6175.2,5637.8 6332.68,5637.8 6332.68,5933.07 6175.2,5933.07
U_Fin on Bottom Layer "U_FIN_L02_P148" (solid, remove dead copper, pour order 148): 5919.29,6661.42 6155.51,6661.42 6155.51,6779.53 5919.29,6779.53
U_Fin on Bottom Layer "U_FIN_L02_P147" (solid, remove dead copper, pour order 147): 5919.29,6346.46 5761.81,6346.46 5761.81,6681.1 5860.24,6779.53 5919.29,6779.53
U_Fin on Bottom Layer "U_FIN_L02_P137" (solid, remove dead copper, pour order 137): 6155.51,6661.42 6312.99,6661.42 6312.99,7015.75 6155.51,7015.75
~U_TS on Bottom Layer "~U_TS_L02_P136" (solid, remove dead copper, pour order 136): 6529.53,5637.8 6687.01,5637.8 6687.01,6287.4 6529.53,6287.4
~U_Fin on Bottom Layer "~U_FIN_L02_P132" (solid, remove dead copper, pour order 132): 6509.84,6464.57 6687.01,6464.57 6687.01,7212.6 6509.84,7212.6
+U_POWER on Bottom Layer "+U_POWER_L02_P128" (solid, remove dead copper, pour order 128): 1844.49,4299.21 2080.71,4299.21 2080.71,4476.38 1844.49,4476.38
+U_POWER on Bottom Layer "+U_POWER_L02_P127" (solid, remove dead copper, pour order 127): 1194.88,4043.31 1844.49,4043.31 1844.49,4476.38 1194.88,4476.38
+U_POWER on Bottom Layer "+U_POWER_L02_P126" (solid, remove dead copper, pour order 126): 820.87,5125.98 1017.72,5125.98 1017.72,5283.46 820.87,5283.46
+U_POWER on Bottom Layer "+U_POWER_L02_P122" (solid, remove dead copper, pour order 122): 1194.88,4338.58 1293.31,4338.58 1293.31,4476.38 1194.88,4476.38
+U_POWER on Bottom Layer "+U_POWER_L02_P121" (solid, remove dead copper, pour order 121): 820.87,4476.38 1293.31,4476.38 1293.31,4574.8 820.87,4574.8
+U_POWER on Bottom Layer "+U_POWER_L02_P120" (solid, remove dead copper, pour order 120): 820.87,3846.46 742.13,3846.46 742.13,3196.85 230.31,3196.85 230.31,3511.81 643.7,3511.81 643.7,7586.61 820.87,7586.61
$6N134 on Bottom Layer "$6N134_L02_P118" (solid, remove dead copper, pour order 118): 1372.05,2724.41 860.24,2724.41 860.24,3393.7 1017.72,3393.7 1017.72,2822.83 1372.05,2822.83
$6N134 on Bottom Layer "$6N134_L02_P117" (solid, remove dead copper, pour order 117): 1293.31,2822.83 1372.05,2822.83 1372.05,2901.57 1293.31,2901.57
$6N134 on Bottom Layer "$6N134_L02_P106" (solid, remove dead copper, pour order 106): 860.24,3846.46 1057.09,3846.46 1057.09,4102.36 860.24,4102.36
$6N135 on Bottom Layer "$6N135_L02_P099" (solid, remove dead copper, pour order 99): 1844.49,3708.66 1923.23,3708.66 1923.23,3807.09 1844.49,3807.09
$6N135 on Bottom Layer "$6N135_L02_P098" (solid, remove dead copper, pour order 98): 1194.88,3748.03 1844.49,3748.03 1844.49,3807.09 1194.88,3807.09
$6N135 on Bottom Layer "$6N135_L02_P092" (solid, remove dead copper, pour order 92): 879.92,4181.1 1057.09,4181.1 1057.09,4417.32 879.92,4417.32
$6N135 on Bottom Layer "$6N135_L02_P090" (solid, remove dead copper, pour order 90): 840.55,3492.13 1844.49,3492.13 1844.49,3748.03 840.55,3748.03
$6N135 on Bottom Layer "$6N135_L02_P087" (solid, remove dead copper, pour order 87): 1923.23,3708.66 2425.2,3708.66 2425.2,3944.88 1923.23,3944.88
$6N3156 on Bottom Layer "$6N3156_L02_P083" (solid, remove dead copper, pour order 83): 2021.65,2901.57 2297.24,2901.57 2297.24,3196.85 2021.65,3196.85
$6N3156 on Bottom Layer "$6N3156_L02_P081" (solid, remove dead copper, pour order 81): 3498.03,2842.52 3734.25,2842.52 3734.25,3137.8 3498.03,3137.8
$6N3156 on Bottom Layer "$6N3156_L02_P071" (solid, remove dead copper, pour order 71): 2297.24,3118.11 2750,3118.11 2750,3196.85 2297.24,3196.85
$6N3156 on Bottom Layer "$6N3156_L02_P070" (solid, remove dead copper, pour order 70): 2927.17,3078.74 3498.03,3078.74 3498.03,3137.8 2927.17,3137.8
$6N3156 on Bottom Layer "$6N3156_L02_P069" (solid, remove dead copper, pour order 69): 3616.14,3885.83 2927.17,3885.83 2927.17,3078.74 2966.54,3078.74 2966.54,2881.89 2750,2881.89 2750,3925.2 3064.96,4240.16 3616.14,4240.16
$6N106 on Bottom Layer "$6N106_L02_P056" (solid, remove dead copper, pour order 56): 17 vertices, not listed, extent 1431.1,2527.56 3419.29,3059.06
$6N106 on Bottom Layer "$6N106_L02_P054" (solid, remove dead copper, pour order 54): 3124.02,2724.41 3183.07,2783.46 3124.02,2783.46
$6N106 on Bottom Layer "$6N106_L02_P053" (solid, remove dead copper, pour order 53): 2730.32,2724.41 3124.02,2724.41 3124.02,2783.46 2730.32,2783.46
$6N3315 on Bottom Layer "$6N3315_L02_P050" (solid, remove dead copper, pour order 50): 4462.6,3196.85 4620.08,3196.85 4620.08,3413.39 4462.6,3413.39
$6N3315 on Bottom Layer "$6N3315_L02_P049" (solid, remove dead copper, pour order 49): 4442.91,3944.88 4600.39,3944.88 4600.39,4181.1 4442.91,4181.1
+U_AMP on Bottom Layer "+U_AMP_L02_P041" (solid, remove dead copper, pour order 41): 6687.01,5362.2 6273.62,5362.2 6273.62,5027.56 6312.99,4988.19 6312.99,4771.65 6687.01,4771.65 6687.01,4633.86 6214.57,4633.86 6214.57,4870.08 5328.74,4870.08 5328.74,5007.87 6175.2,5007.87 6175.2,5460.63 6687.01,5460.63
$6N94 on Bottom Layer "$6N94_L02_P035" (solid, remove dead copper, pour order 35): 4127.95,2409.45 3812.99,2409.45 3812.99,3196.85 3025.59,3196.85 3025.59,3688.98 3616.14,3688.98 3616.14,3295.28 3911.42,3295.28 3911.42,2763.78 4127.95,2763.78
$6N94 on Bottom Layer "$6N94_L02_P031" (solid, remove dead copper, pour order 31): 5564.96,2842.52 4856.3,2842.52 4856.3,3472.44 5427.17,3472.44 5427.17,3314.96 5564.96,3314.96
$6N101 on Bottom Layer "$6N101_L02_P024" (solid, remove dead copper, pour order 24): 5722.44,4673.23 5584.65,4535.43 5584.65,3669.29 5486.22,3669.29 5486.22,3590.55 4856.3,3590.55 4856.3,3925.2 5072.83,3925.2 5072.83,4555.12 5427.17,4555.12 5427.17,4771.65 5722.44,4771.65
$6N737 on Bottom Layer "$6N737_L02_P020" (solid, remove dead copper, pour order 20): 4777.56,2724.41 4226.38,2724.41 4226.38,2842.52 3990.16,2842.52 3990.16,3374.02 3753.94,3374.02 3753.94,3629.92 4324.8,3629.92 4324.8,3374.02 4088.58,3374.02 4088.58,2980.32 4777.56,2980.32
$6N737 on Bottom Layer "$6N737_L02_P016" (solid, remove dead copper, pour order 16): 5289.37,2409.45 5742.13,2409.45 5742.13,2625.98 5289.37,2625.98
$6N737 on Bottom Layer "$6N737_L02_P015" (solid, remove dead copper, pour order 15): 6687.01,2803.15 6293.31,2803.15 6293.31,2409.45 5742.13,2409.45 5742.13,3295.28 5879.92,3295.28 5879.92,3472.44 6687.01,3472.44
$6N737 on Bottom Layer "$6N737_L02_P014" (solid, remove dead copper, pour order 14): 4226.38,2625.98 5742.13,2625.98 5742.13,2724.41 4226.38,2724.41
$6N737 on Bottom Layer "$6N737_L02_P013" (solid, remove dead copper, pour order 13): 4226.38,2507.87 5033.46,2507.87 5033.46,2625.98 4226.38,2625.98
-U_AMP on Bottom Layer "-U_AMP_L02_P003" (solid, remove dead copper, pour order 3): 6687.01,3590.55 5879.92,3590.55 5879.92,3669.29 5761.81,3669.29 5761.81,4437.01 5840.55,4515.75 5840.55,4771.65 6135.83,4771.65 6135.83,4515.75 6687.01,4515.75
-U_AMP on Bottom Layer "-U_AMP_L02_P002" (solid, remove dead copper, pour order 2): 6352.36,5165.35 6687.01,5165.35 6687.01,5263.78 6352.36,5263.78
no net on Bottom Layer (solid, remove dead copper, pour order 1): 1598.43,5913.39 1647.64,5962.6 1598.43,5962.6
I_AMP on Mid Layer 2 "I_AMP_L-01_P643" (solid, remove dead copper, pour order 643): 4935.04,4692.91 4620.08,4692.91 4620.08,4889.76 4482.28,4889.76 4482.28,5007.87 4935.04,5007.87
GND_UM on Mid Layer 2 "GND_UM_L-01_P638" (solid, remove dead copper, pour order 638): 5153.54,9190.94 3468.5,9190.94 3468.5,10017.72 3793.31,10017.72 3793.31,11051.18 4187.01,11051.18 4187.01,10775.59 4531.5,10775.59 4531.5,10578.74 5153.54,10578.74
GND_UM on Mid Layer 2 "GND_UM_L-01_P612" (solid, remove dead copper, pour order 612): 21 vertices, not listed, extent 3242.13,11051.18 6687.01,12389.76
$4N2819 on Mid Layer 2 "$4N2819_L-01_P592" (solid, remove dead copper, pour order 592): 1972.44,11917.32 2120.08,11917.32 2120.08,12035.43 1972.44,12035.43
$4N2819 on Mid Layer 2 "$4N2819_L-01_P589" (solid, remove dead copper, pour order 589): 2120.08,11877.95 1942.91,11877.95 1942.91,11700.79 1165.35,11700.79 1165.35,12074.8 2120.08,12074.8
$4N2811 on Mid Layer 2 "$4N2811_L-01_P585" (solid, remove dead copper, pour order 585): 1972.44,11720.47 2120.08,11720.47 2120.08,11838.58 1972.44,11838.58
$4N2807 on Mid Layer 2 "$4N2807_L-01_P578" (solid, remove dead copper, pour order 578): 1559.06,10972.44 1076.77,10972.44 1076.77,11120.08 899.61,11120.08 899.61,11671.26 1559.06,11671.26
$4N2806 on Mid Layer 2 "$4N2806_L-01_P574" (solid, remove dead copper, pour order 574): 899.61,10972.44 1047.24,10972.44 1047.24,11090.55 899.61,11090.55
$4N4014 on Mid Layer 2 "$4N4014_L-01_P569" (solid, remove dead copper, pour order 569): 250,9496.06 535.43,9496.06 535.43,9663.39 250,9663.39
$4N4014 on Mid Layer 2 "$4N4014_L-01_P563" (solid, remove dead copper, pour order 563): 427.17,9761.81 683.07,9761.81 683.07,9899.61 427.17,9899.61
$4N4005 on Mid Layer 2 "$4N4005_L-01_P560" (solid, remove dead copper, pour order 560): 397.64,9948.82 624.02,9948.82 624.02,10175.2 397.64,10175.2
$4N4005 on Mid Layer 2 "$4N4005_L-01_P552" (solid, remove dead copper, pour order 552): 250,9742.13 397.64,9742.13 397.64,10175.2 250,10175.2
$4N4008 on Mid Layer 2 "$4N4008_L-01_P551" (solid, remove dead copper, pour order 551): 279.53,10549.21 584.65,10549.21 584.65,10834.65 279.53,10834.65
$4N4016 on Mid Layer 2 "$4N4016_L-01_P548" (solid, remove dead copper, pour order 548): 33.46,9496.06 210.63,9496.06 210.63,10824.8 33.46,10824.8
$4N4016 on Mid Layer 2 "$4N4016_L-01_P545" (solid, remove dead copper, pour order 545): 555.12,9496.06 683.07,9496.06 683.07,9683.07 555.12,9683.07
$4N4016 on Mid Layer 2 "$4N4016_L-01_P544" (solid, remove dead copper, pour order 544): 210.63,9683.07 683.07,9683.07 683.07,9722.44 210.63,9722.44
$4N4016 on Mid Layer 2 "$4N4016_L-01_P543" (solid, remove dead copper, pour order 543): 791.34,10214.57 210.63,10214.57 210.63,10490.16 702.76,10490.16 702.76,10834.65 791.34,10834.65
-U_VENT on Mid Layer 2 "-U_VENT_L-01_P527" (solid, remove dead copper, pour order 527): 1037.4,12114.17 1726.38,12114.17 1726.38,12232.28 1037.4,12232.28
-U_VENT on Mid Layer 2 "-U_VENT_L-01_P522" (solid, remove dead copper, pour order 522): 1125.98,11710.63 860.24,11710.63 860.24,10864.17 417.32,10864.17 417.32,10992.13 761.81,10992.13 761.81,12389.76 1125.98,12389.76
-U_VENT on Mid Layer 2 "-U_VENT_L-01_P521" (solid, remove dead copper, pour order 521): 1125.98,12232.28 1332.68,12232.28 1332.68,12389.76 1125.98,12389.76
+U_VENT on Mid Layer 2 "+U_VENT_L-01_P511" (solid, remove dead copper, pour order 511): 732.28,11021.65 387.8,11021.65 387.8,10864.17 43.31,10864.17 43.31,11070.87 624.02,11070.87 624.02,11838.58 515.75,11838.58 515.75,12389.76 732.28,12389.76
$4N2816 on Mid Layer 2 "$4N2816_L-01_P499" (solid, remove dead copper, pour order 499): 43.31,11090.55 594.49,11090.55 594.49,11248.03 43.31,11248.03
-U_UM on Mid Layer 2 "-U_UM_L-01_P492" (solid, remove dead copper, pour order 492): 250,11297.24 417.32,11297.24 417.32,12094.49 250,12094.49
+U_UM on Mid Layer 2 "+U_UM_L-01_P491" (solid, remove dead copper, pour order 491): 43.31,11366.14 190.94,11366.14 190.94,12094.49 43.31,12094.49
+U_UM on Mid Layer 2 "+U_UM_L-01_P487" (solid, remove dead copper, pour order 487): 43.31,11267.72 190.94,11267.72 190.94,12094.49 43.31,12094.49
+15V on Mid Layer 2 "+15V_L-01_P486" (solid, remove dead copper, pour order 486): 2080.71,7438.98 2129.92,7438.98 2129.92,7537.4 2080.71,7537.4
+15V on Mid Layer 2 "+15V_L-01_P485" (solid, remove dead copper, pour order 485): 3527.56,7409.45 3576.77,7409.45 3576.77,7537.4 3527.56,7537.4
+15V on Mid Layer 2 "+15V_L-01_P479" (solid, remove dead copper, pour order 479): 3527.56,7409.45 3576.77,7409.45 3576.77,7478.35 3527.56,7478.35
+15V on Mid Layer 2 "+15V_L-01_P477" (solid, remove dead copper, pour order 477): 2238.19,7537.4 3576.77,7537.4 3576.77,7586.61 2238.19,7586.61
+15V on Mid Layer 2 "+15V_L-01_P476" (solid, remove dead copper, pour order 476): 2129.92,7438.98 2287.4,7438.98 2287.4,7488.19 2129.92,7488.19
+15V on Mid Layer 2 "+15V_L-01_P475" (solid, remove dead copper, pour order 475): 2238.19,7488.19 2287.4,7488.19 2287.4,7537.4 2238.19,7537.4
GND on Mid Layer 2 "GND_L-01_P474" (solid, remove dead copper, pour order 474): 84 vertices, not listed, extent 692.91,5116.14 6687.01,12389.76
GND on Mid Layer 2 "GND_L-01_P467" (solid, remove dead copper, pour order 467): 35 vertices, not listed, extent 1401.57,3324.8 4413.39,6110.24
$2N3778 on Mid Layer 2 "$2N3778_L-01_P388" (solid, remove dead copper, pour order 388): 3625.98,7025.59 3694.88,7025.59 3694.88,7104.33 3625.98,7104.33
$2N3800 on Mid Layer 2 "$2N3800_L-01_P384" (solid, remove dead copper, pour order 384): 2188.98,7025.59 2287.4,7025.59 2287.4,7104.33 2188.98,7104.33
UL on Mid Layer 2 "UL_L-01_P381" (solid, remove dead copper, pour order 381): 4265.75,6907.48 4177.17,6907.48 4177.17,6720.47 4147.64,6690.94 3921.26,6690.94 3921.26,7242.13 4265.75,7242.13
UL on Mid Layer 2 "UL_L-01_P380" (solid, remove dead copper, pour order 380): 3665.35,6818.9 3665.35,6326.77 3025.59,6326.77 3025.59,6700.79 3163.39,6700.79 3163.39,6366.14 3527.56,6366.14 3527.56,6976.38 3665.35,6976.38
UL on Mid Layer 2 "UL_L-01_P375" (solid, remove dead copper, pour order 375): 3665.35,6238.19 3192.91,6238.19 3192.91,5913.39 2513.78,5913.39 2513.78,6100.39 3025.59,6100.39 3025.59,6759.84 3163.39,6759.84 3163.39,6366.14 3527.56,6366.14 3527.56,6612.2 3665.35,6612.2
UL on Mid Layer 2 "UL_L-01_P367" (solid, remove dead copper, pour order 367): 673.23,8137.8 889.76,8137.8 889.76,8334.65 673.23,8334.65
UL on Mid Layer 2 "UL_L-01_P365" (solid, remove dead copper, pour order 365): 2218.5,5913.39 2149.61,5913.39 2149.61,5962.6 1598.43,5962.6 1598.43,5913.39 889.76,5913.39 889.76,8334.65 1007.87,8334.65 1007.87,6070.87 1618.11,6070.87 1627.95,6080.71 2218.5,6080.71
UL on Mid Layer 2 "UL_L-01_P360" (solid, remove dead copper, pour order 360): 3665.35,6238.19 3025.59,6238.19 3025.59,6612.2 3163.39,6612.2 3163.39,6366.14 3527.56,6366.14 3527.56,6612.2 3665.35,6612.2
~U_TP on Mid Layer 2 "~U_TP_L-01_P355" (solid, remove dead copper, pour order 355): 958.66,9013.78 141.73,9013.78 141.73,8334.65 624.02,8334.65 624.02,8147.64 417.32,8147.64 417.32,8059.06 53.15,8059.06 53.15,8334.65 43.31,8334.65 43.31,9112.2 958.66,9112.2
U_TP on Mid Layer 2 "U_TP_L-01_P353" (solid, remove dead copper, pour order 353): 1066.93,8433.07 230.31,8433.07 230.31,8895.67 998.03,8895.67 998.03,8797.24 850.39,8797.24 850.39,8511.81 1066.93,8511.81
$2N2430 on Mid Layer 2 "$2N2430_L-01_P347" (solid, remove dead copper, pour order 347): 2100.39,5726.38 1017.72,5726.38 1017.72,5844.49 1657.48,5844.49 1657.48,5903.54 2100.39,5903.54
U_MOST on Mid Layer 2 "U_MOST_L-01_P340" (solid, remove dead copper, pour order 340): 1076.77,5509.84 1185.04,5509.84 1185.04,5667.32 1076.77,5667.32
U_MOST on Mid Layer 2 "U_MOST_L-01_P339" (solid, remove dead copper, pour order 339): 2385.83,5500 2179.13,5500 2110.24,5568.9 1568.9,5568.9 1549.21,5588.58 1303.15,5588.58 1303.15,5450.79 1185.04,5450.79 1185.04,5667.32 1637.8,5667.32 1657.48,5647.64 2159.45,5647.64 2188.98,5677.17 2385.83,5677.17
I_MOST on Mid Layer 2 "I_MOST_L-01_P334" (solid, remove dead copper, pour order 334): 1096.46,5322.83 1303.15,5322.83 1303.15,5342.52 1096.46,5342.52
I_MOST on Mid Layer 2 "I_MOST_L-01_P332" (solid, remove dead copper, pour order 332): 1303.15,5342.52 879.92,5342.52 879.92,5490.16 1165.35,5490.16 1165.35,5440.94 1303.15,5440.94
UH on Mid Layer 2 "UH_L-01_P330" (solid, remove dead copper, pour order 330): 2838.58,6986.22 2750,6986.22 2750,6681.1 2690.94,6622.05 2533.46,6622.05 2474.41,6681.1 2474.41,6789.37 2435.04,6789.37 2435.04,7232.28 2838.58,7232.28
UH on Mid Layer 2 "UH_L-01_P329" (solid, remove dead copper, pour order 329): 2257.87,6789.37 2257.87,6661.42 2208.66,6612.2 2120.08,6612.2 2120.08,6976.38 2257.87,6976.38
UH on Mid Layer 2 "UH_L-01_P324" (solid, remove dead copper, pour order 324): 2208.66,6149.61 1588.58,6149.61 1588.58,6838.58 1706.69,6838.58 1706.69,6366.14 2070.87,6366.14 2070.87,6612.2 2208.66,6612.2
UH on Mid Layer 2 "UH_L-01_P323" (solid, remove dead copper, pour order 323): 1086.61,6730.31 1588.58,6730.31 1588.58,6838.58 1086.61,6838.58
UH on Mid Layer 2 "UH_L-01_P322" (solid, remove dead copper, pour order 322): 1086.61,6838.58 1214.57,6838.58 1214.57,8511.81 1086.61,8511.81
PGND on Mid Layer 2 "PGND_L-01_P315" (solid, remove dead copper, pour order 315): 1312.99,4791.34 1460.63,4791.34 1460.63,5263.78 1312.99,5263.78
PGND on Mid Layer 2 "PGND_L-01_P314" (solid, remove dead copper, pour order 314): 1431.1,4653.54 1598.43,4653.54 1598.43,4919.29 1431.1,4919.29
PGND on Mid Layer 2 "PGND_L-01_P313" (solid, remove dead copper, pour order 313): 2179.13,5027.56 2612.2,5027.56 2612.2,5440.94 2179.13,5440.94
PGND on Mid Layer 2 "PGND_L-01_P308" (solid, remove dead copper, pour order 308): 3970.47,5627.95 2681.1,5627.95 2681.1,5431.1 2553.15,5431.1 2553.15,5440.94 2671.26,5440.94 2671.26,5637.8 3960.63,5637.8 3960.63,5814.96 3970.47,5814.96
PGND on Mid Layer 2 "PGND_L-01_P306" (solid, remove dead copper, pour order 306): 3773.62,4309.06 3045.28,4309.06 2750,4013.78 2750,4190.94 3015.75,4456.69 3773.62,4456.69
PGND on Mid Layer 2 "PGND_L-01_P301" (solid, remove dead copper, pour order 301): 19 vertices, not listed, extent 33.46,6927.17 1372.05,9446.85
PGND on Mid Layer 2 "PGND_L-01_P300" (solid, remove dead copper, pour order 300): 33.46,9397.64 574.8,9397.64 574.8,9427.17 33.46,9427.17
PGND on Mid Layer 2 "PGND_L-01_P294" (solid, remove dead copper, pour order 294): 2897.64,6907.48 3183.07,6907.48 3183.07,7025.59 2897.64,7025.59
PGND on Mid Layer 2 "PGND_L-01_P293" (solid, remove dead copper, pour order 293): 2809.06,6887.8 2828.74,6887.8 2828.74,6907.48 2809.06,6907.48
PGND on Mid Layer 2 "PGND_L-01_P288" (solid, remove dead copper, pour order 288): 3606.3,7064.96 3458.66,7064.96 3458.66,6681.1 3222.44,6681.1 3222.44,6799.21 2937.01,6799.21 2937.01,6612.2 2828.74,6612.2 2828.74,6907.48 3183.07,6907.48 3183.07,7153.54 3606.3,7153.54
PGND on Mid Layer 2 "PGND_L-01_P281" (solid, remove dead copper, pour order 281): 1431.1,4574.8 2139.76,4574.8 2139.76,4692.91 1431.1,4692.91
PGND on Mid Layer 2 "PGND_L-01_P280" (solid, remove dead copper, pour order 280): 1539.37,3078.74 1942.91,3078.74 1942.91,3275.59 1539.37,3275.59
PGND on Mid Layer 2 "PGND_L-01_P279" (solid, remove dead copper, pour order 279): 1942.91,3147.64 2129.92,3334.65 1942.91,3334.65
PGND on Mid Layer 2 "PGND_L-01_P263" (solid, remove dead copper, pour order 263): 2238.19,5076.77 2543.31,5076.77 2543.31,5431.1 2238.19,5431.1
PGND on Mid Layer 2 "PGND_L-01_P258" (solid, remove dead copper, pour order 258): 1942.91,3334.65 2139.76,3334.65 2139.76,3393.7 1942.91,3393.7
PGND on Mid Layer 2 "PGND_L-01_P256" (solid, remove dead copper, pour order 256): 4561.02,3531.5 4442.91,3531.5 4442.91,3787.4 3773.62,3787.4 3773.62,3925.2 4305.12,3925.2 4305.12,3846.46 4561.02,3846.46
PGND on Mid Layer 2 "PGND_L-01_P251" (solid, remove dead copper, pour order 251): 4561.02,4299.21 4305.12,4299.21 4305.12,3925.2 3773.62,3925.2 3773.62,4456.69 4561.02,4456.69
PGND on Mid Layer 2 "PGND_L-01_P248" (solid, remove dead copper, pour order 248): 2828.74,2468.5 3104.33,2468.5 3104.33,2645.67 2828.74,2645.67
PGND on Mid Layer 2 "PGND_L-01_P247" (solid, remove dead copper, pour order 247): 1824.8,2409.45 3104.33,2409.45 3104.33,2468.5 1824.8,2468.5
PGND on Mid Layer 2 "PGND_L-01_P237" (solid, remove dead copper, pour order 237): 151.57,5716.54 515.75,5716.54 515.75,5962.6 151.57,5962.6
PGND on Mid Layer 2 "PGND_L-01_P232" (solid, remove dead copper, pour order 232): 250,4653.54 348.43,4751.97 250,4751.97
PGND on Mid Layer 2 "PGND_L-01_P217" (solid, remove dead copper, pour order 217): 35 vertices, not listed, extent 33.46,2409.45 1824.8,7192.91
PGND on Mid Layer 2 "PGND_L-01_P207" (solid, remove dead copper, pour order 207): 3291.34,5893.7 3714.57,5893.7 3714.57,6179.13 3291.34,6179.13
PGND on Mid Layer 2 "PGND_L-01_P203" (solid, remove dead copper, pour order 203): 1342.52,6149.61 1480.32,6149.61 1480.32,6612.2 1342.52,6612.2
PGND on Mid Layer 2 "PGND_L-01_P197" (solid, remove dead copper, pour order 197): 496.06,7714.57 830.71,7714.57 830.71,8078.74 496.06,8078.74
PGND on Mid Layer 2 "PGND_L-01_P187" (solid, remove dead copper, pour order 187): 2061.02,6730.31 1942.91,6612.2 1795.28,6612.2 1795.28,7064.96 2061.02,7064.96
PGND on Mid Layer 2 "PGND_L-01_P186" (solid, remove dead copper, pour order 186): 1322.83,6927.17 1795.28,6927.17 1795.28,7064.96 1322.83,7064.96
PGND on Mid Layer 2 "PGND_L-01_P185" (solid, remove dead copper, pour order 185): 1903.54,7064.96 2169.29,7064.96 2169.29,7153.54 1903.54,7153.54
PGND on Mid Layer 2 "PGND_L-01_P183" (solid, remove dead copper, pour order 183): 2937.01,6169.29 2513.78,6169.29 2513.78,6415.35 2779.53,6415.35 2779.53,6582.68 2809.06,6612.2 2937.01,6612.2
PGND on Mid Layer 2 "PGND_L-01_P182" (solid, remove dead copper, pour order 182): 2809.06,6612.2 2937.01,6612.2 2937.01,6887.8 2809.06,6887.8
PGND on Mid Layer 2 "PGND_L-01_P180" (solid, remove dead copper, pour order 180): 2041.34,3393.7 2139.76,3393.7 2139.76,3620.08 2041.34,3620.08
PGND on Mid Layer 2 "PGND_L-01_P179" (solid, remove dead copper, pour order 179): 2041.34,4023.62 2139.76,4023.62 2139.76,4624.02 2041.34,4624.02
PGND on Mid Layer 2 "PGND_L-01_P178" (solid, remove dead copper, pour order 178): 3960.63,5814.96 4118.11,5814.96 4118.11,6415.35 3960.63,6415.35